# Altium PCB PCB_Button_Board_v2.3.PcbDoc (part 2 of 2)
Units mil, origin at the board's own origin, x right, y up, seen from the top; angles counter-clockwise.
Board outline 1338.58 x 1496.06 mil, 4 copper layers (Top Layer, GND, POWER, Bottom Layer), stack 61.811 mil thick; 73 components, 46 nets, 199 pads, 133 vias.
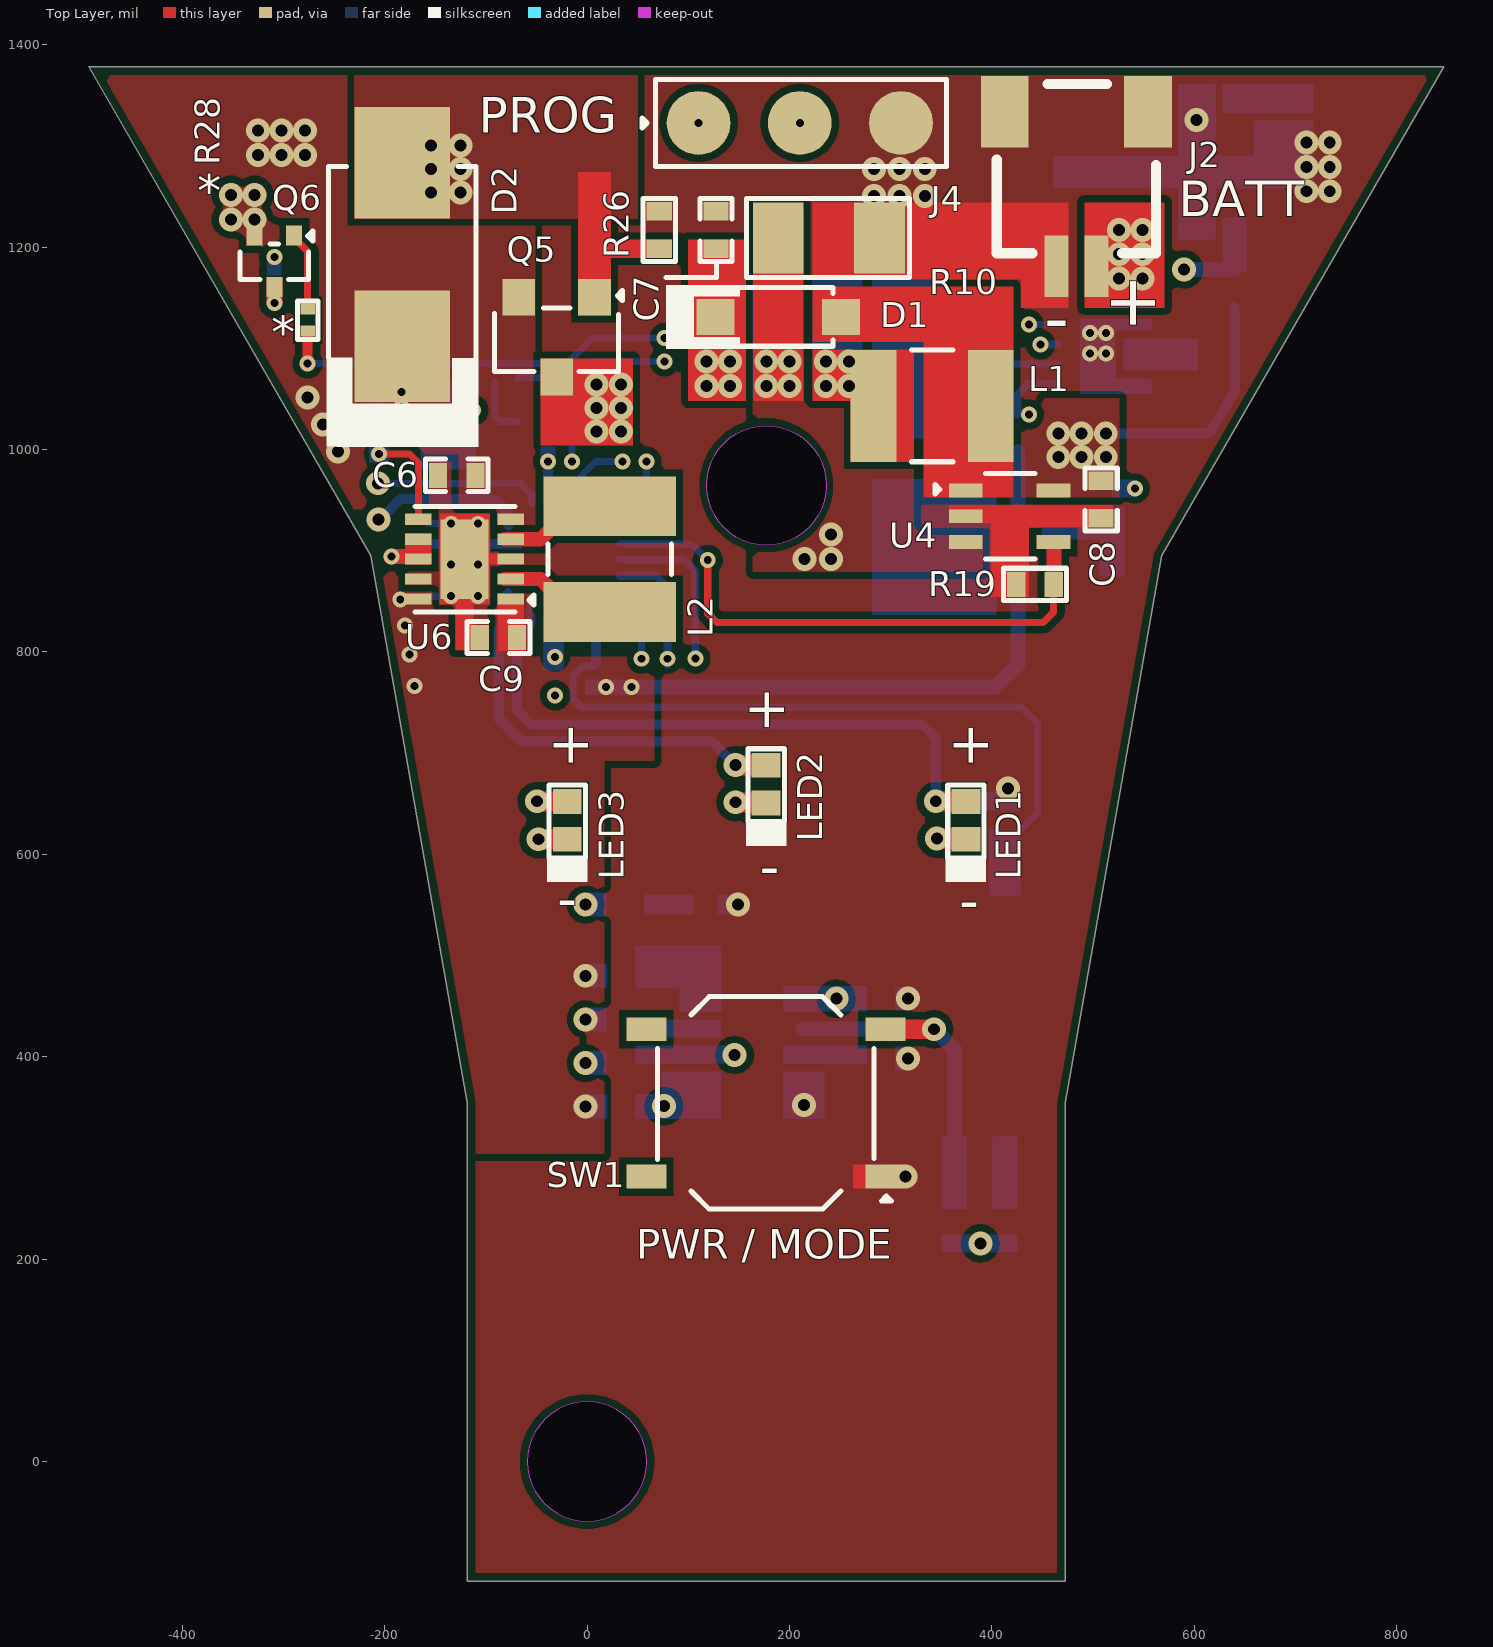
[diagram p0: Top Layer view]

## Part data (continued)
R21: library part RC0402FR-071KL, "RES 1K OHM 1% 1/16W 0402", Case Code (Imperial)=0402, Case Code (Metric)=1005, LCSC Part Number=C106235, Manufacturer=Yageo, Max Operating Temperature=155°C, Max Power Dissipation=63mW, Min Operating Temperature=-55°C, Power Rating=62.5mW, Resistance=1kR, Resistance Tolerance=1%, Resistor Type="Thick Film", Temperature Coefficient=100ppm/°C, Voltage Rating=50V, Case/Package=0402, Category="Chip SMD Resistors", ComponentLink1Description=https://datasheet.ciiva.com/11819/0900766b80c66297-11819477.pdf?src-supplier=RSComponents, ComponentLink1URL=https://datasheet.ciiva.com/11819/0900766b80c66297-11819477.pdf?src-supplier=RSComponents, ComponentLink2Description=https://datasheet.ciiva.com/7983/1018594-7983502.pdf?src-supplier=Element14, ComponentLink2URL=https://datasheet.ciiva.com/7983/1018594-7983502.pdf?src-supplier=Element14, ComponentLink3Description=https://datasheet.ciiva.com/22747/1018594-22747513.pdf?src-supplier=Element14, ComponentLink3URL=https://datasheet.ciiva.com/22747/1018594-22747513.pdf?src-supplier=Element14, ComponentLink4Description=https://datasheet.ciiva.com/12666/pyu-rc0402-51-rohs-l-6-r-12666741.pdf?src-supplier=Mouser, ComponentLink4URL=https://datasheet.ciiva.com/12666/pyu-rc0402-51-rohs-l-6-r-12666741.pdf?src-supplier=Mouser, ComponentLink5Description=https://datasheet.ciiva.com/7849/1018594-7849869.pdf?src-supplier=Element14, ComponentLink5URL=https://datasheet.ciiva.com/7849/1018594-7849869.pdf?src-supplier=Element14, ComponentLink6Description=https://datasheet.ciiva.com/7849/1018594-7849871.pdf?src-supplier=Element14, ComponentLink6URL=https://datasheet.ciiva.com/7849/1018594-7849871.pdf?src-supplier=Element14, ComponentLink7Description=https://datasheet.ciiva.com/17063/pyu-rc0402-51-rohs-l-6-r-17063193.pdf?src-supplier=Future+Electronics, ComponentLink7URL=https://datasheet.ciiva.com/17063/pyu-rc0402-51-rohs-l-6-r-17063193.pdf?src-supplier=Future+Electronics, Construction=Rectangular, Depth=0.5mm, Features="Moisture Resistant", Height=0.32mm, Item Type=Resistor, Lead Free="Lead Free", Length=1mm, Manufacturer Part Number=RC0402FR-071KL, Military Standard=Not, Number of Pins=2, Number of Terminations=2, Packaging="Tape and Reel", Pricing 1="10000=0.00085, 20000=0.00087, 40000=0.00084, 60000=0.00083, 80000=0.00079, 100000=0.00078, 1000000=0.00076 (USD)", Reach SVHC Compliant=Yes, RoHS=Yes, RoHS Compliant=Yes, Series=RC, Size Code=0402, Stock 1=13030000, Supplier 1=Avnet, Supplier Part Number 1=RC0402FR-071KL, Technology="THICK FILM", Termination=SMD/SMT, Tolerance=1%, Voltage Rating (DC)=50V, Width=0.5mm
R24 R25 R28: library part RC0201FR-072K2L, "RES 2.2K OHM 1% 1/20W 0201", Case Code (Imperial)=0201, Case Code (Metric)=0603, LCSC Part Number=C142018, Manufacturer=Yageo, Max Operating Temperature=125°C, Max Power Dissipation=50mW, Min Operating Temperature=-55°C, Resistance=2.2kR, Resistance Tolerance=1%, Resistor Type="Thick Film", Temperature Coefficient=200ppm/°C, Voltage Rating=25V, Case/Package=0201, Category="Chip SMD Resistors", ComponentLink1Description=https://datasheet.ciiva.com/7672/1563626-7672218.pdf?src-supplier=Element14, ComponentLink1URL=https://datasheet.ciiva.com/7672/1563626-7672218.pdf?src-supplier=Element14, Construction=Rectangular, Depth=0.3mm, Features="Moisture Resistant", Height=0.01inch, Item Type=Resistor, Lead Free="Lead Free", Length=0.024inch, Manufacturer Part Number=RC0201FR-072K2L, Military Standard=Not, Number of Terminations=2, Packaging="Tape and Reel", Power Rating=50mW, Pricing 1="10000=0.00510, 30000=0.00350, 50000=0.00330, 100000=0.00220 (USD)", RoHS=Yes, RoHS Compliant=Yes, Series=RC, Size Code=0201, Stock 1=90000, Supplier 1="Arrow Electronics", Supplier Part Number 1=RC0201FR-072K2L, Termination=SMD/SMT, Tolerance=1%, Width=0.3mm
R29: library part RC0201FR-0733RL, "RES 33 OHM 1% 1/20W 0201", LCSC Part Number=C295794, Manufacturer=Yageo, Supplier Part Number=6199285, Category="Chip SMD Resistors", ComponentLink1Description=https://datasheet.ciiva.com/2560/pyu-r-int-thick-7-2560877.pdf?src-supplier=Digi-Key, ComponentLink1URL=https://datasheet.ciiva.com/2560/pyu-r-int-thick-7-2560877.pdf?src-supplier=Digi-Key, ComponentLink2Description=https://datasheet.ciiva.com/2560/pyu-r-int-thick-7-2560878.pdf?src-supplier=Digi-Key, ComponentLink2URL=https://datasheet.ciiva.com/2560/pyu-r-int-thick-7-2560878.pdf?src-supplier=Digi-Key, ComponentLink3Description=https://datasheet.ciiva.com/2560/pyu-r-int-thick-7-2560879.pdf?src-supplier=Digi-Key, ComponentLink3URL=https://datasheet.ciiva.com/2560/pyu-r-int-thick-7-2560879.pdf?src-supplier=Digi-Key, ComponentLink4Description=https://datasheet.ciiva.com/7672/1563626-7672223.pdf?src-supplier=Element14, ComponentLink4URL=https://datasheet.ciiva.com/7672/1563626-7672223.pdf?src-supplier=Element14, ComponentLink5Description=https://datasheet.ciiva.com/22698/1563626-22698520.pdf?src-supplier=Element14, ComponentLink5URL=https://datasheet.ciiva.com/22698/1563626-22698520.pdf?src-supplier=Element14, Item Type=Resistor, Manufacturer Part Number=RC0201FR-0733RL, Pricing="10000=0.0013, 50000=0.0012, 250000=0.0012, 750000=0.0011, 2000000=0.001 (USD)", RoHS=Yes, Stock=1420000, Supplier="Future Electronics"
SW1: "No Gull Wing 50mA 100MΩ 80000 260gf@±50gf 12V -25℃~+85℃ 1.7mm Golden Round Button Brick nogging SPST SMD Tactile Switches ROHS", LCSC Part Number=C2845290, Manufacturer=HCTL, ComponentLink1Description=LCSC, ComponentLink1URL=https://www.lcsc.com/product-detail/Tactile-Switches_HCTL-TC-0522C-1-7-260G_C2845290.html, Item Type=Switch, Manufacturer Part Number=TC-0522C-1.7-260G
U1: "4.5V~5.5V 锂离子/Polymer 1 600mA SOT-23-5 Battery Management ICs ROHS", LCSC Part Number=C382138, Manufacturer=TPOWER, Package=SOT-23-5, ComponentLink1Description=LCSC, ComponentLink1URL=https://www.lcsc.com/product-detail/Battery-Management-ICs_TPOWER-TP4054_C382138.html, Item Type=IC, Manufacturer Part Number=TP4054
U2: "IC Pb On/off Controller TSOT23-8", Case/Package=SOT-23-8, LCSC Part Number=C683746, Manufacturer="Analog Devices / Linear Technology", Max Operating Temperature=85°C, Min Operating Temperature=-40°C, Operating Supply Current=6uA, Package Quantity=2500, Supplier Part Number 1=584-C2950ITS8-2TRPBF, Category="Integrated Circuits (ICs)", ComponentLink1Description=https://datasheet.ciiva.com/1967/7377-1967658.pdf?src-supplier=Digi-Key, ComponentLink1URL=https://datasheet.ciiva.com/1967/7377-1967658.pdf?src-supplier=Digi-Key, Item Type=IC, Length=2.9mm, Manufacturer Part Number=LTC2950ITS8-2#TRPBF, Number of Pins=8, Packaging="Tape and Reel", Pricing 1="1=6.42, 10=5.8, 50=5.53, 100=4.8, 1000=3.76, 10000=3.62 (USD)", RoHS=Yes, RoHS Compliant=Yes, Series=-, Stock 1=260, Supplier 1=Mouser
U3: "AVR tinyAVR™ 1, Functional Safety (FuSa) Microcontroller IC 8-Bit 20MHz 16KB (16K x 8) FLASH 20-VQFN (3x3)", Digikey Part Number=ATTINY1616-MNRDKR-ND, Manufacturer="Microchip Tech", Package=QFN-20-EP(3x3), ComponentLink1Description="Digikey Link", ComponentLink1URL=https://www.digikey.com/en/products/detail/microchip-technology/ATTINY1616-MNR/7354618?s=N4IgTCBcDaIIIBUEEkByBNAjANhwWgFlUAlEAXQF8g, Item Type=IC, Manufacturer Part Number=ATTINY1616-MNR
U4: "IC LED DRV RGLTR PWM 1.2A SC70-5", LCSC Part Number=C2928788, Manufacturer="Texas Instruments", Item Type=IC, Manufacturer Part Number=TPS92360DCKR, Pricing="1=0.91, 10=0.817, 25=0.7748, 100=0.6366, 250=0.59508, 500=0.52588, 1000=0.41517 (USD)", RoHS=No, Stock=4572, Supplier=Digikey
U5: "IC BATT MON LI-ION 1CELL 8TDFN", LCSC Part Number=C2682616, Manufacturer=Maxim, Max Operating Temperature=85°C, Min Operating Temperature=-20°C, Operating Supply Current=23uA, Operating Supply Voltage=4.5V, Output Voltage=400mV, Package Quantity=10000, Supplier Part Number 1=700-MAX17048G+T10, Category="Battery Management", ComponentLink1Description=https://datasheet.ciiva.com/14083/max17048-max17049-14083973.pdf?src-supplier=Digi-Key, ComponentLink1URL=https://datasheet.ciiva.com/14083/max17048-max17049-14083973.pdf?src-supplier=Digi-Key, Contact Plating=Tin,Matte, Item Type=IC, Manufacturer Part Number=MAX17048G+T10, Mount="Surface Mount", Number of Pins=8, Packaging="Tape and Reel", Pricing 1="1=3.34000, 10=3.00000, 50=2.84000, 100=2.46000, 1000=1.89000, 10000=1.83000 (USD)", Radiation Hardening=No, RoHS=Yes, RoHS Compliant=Yes, Series=ModelGauge™, Stock 1=41293, Supplier 1=Mouser
U6: "IC REG BUCK BST 3.3V 0.9A 10SON", LCSC Part Number=296-39461-1-ND, Manufacturer="Texas Instruments", ComponentLink1Description=https://datasheet.ciiva.com/2034/tps63030-2034702.pdf?src-supplier=Digikey, ComponentLink1URL=https://datasheet.ciiva.com/2034/tps63030-2034702.pdf?src-supplier=Digikey, ComponentLink2Description=https://datasheet.ciiva.com/3221/tps63030-3221513.pdf?src-supplier=Avnet, ComponentLink2URL=https://datasheet.ciiva.com/3221/tps63030-3221513.pdf?src-supplier=Avnet, Item Type=IC, Manufacturer Part Number=TPS63031DSKR, Pricing="1=2.06, 10=1.847, 25=1.7424, 100=1.4844, 250=1.3938, 500=1.21958, 1000=1.0105 (USD)", RoHS=Yes, Stock=6304, Supplier=Digikey
U7: "OPTOISOLATOR 3.75KV TRANS 4-SOP", LCSC Part Number=C81148, Manufacturer="Vishay Semiconductors", Voltage Rating (DC)=70V, ComponentLink1Description=https://datasheet.ciiva.com/11772/0900766b80e30939-11772485.pdf?src-supplier=Rs, ComponentLink1URL=https://datasheet.ciiva.com/11772/0900766b80e30939-11772485.pdf?src-supplier=Rs, ComponentLink2Description=https://datasheet.ciiva.com/27051/1107109-27051440.pdf?src-supplier=Jameco, ComponentLink2URL=https://datasheet.ciiva.com/27051/1107109-27051440.pdf?src-supplier=Jameco, ComponentLink3Description=https://datasheet.ciiva.com/8040/485045-8040879.pdf?src-supplier=Element14, ComponentLink3URL=https://datasheet.ciiva.com/8040/485045-8040879.pdf?src-supplier=Element14, ComponentLink4Description=https://datasheet.ciiva.com/14079/tcmt1100-14079945.pdf?src-supplier=Digikey, ComponentLink4URL=https://datasheet.ciiva.com/14079/tcmt1100-14079945.pdf?src-supplier=Digikey, ComponentLink5Description=https://datasheet.ciiva.com/14079/tcmt1100-14079946.pdf?src-supplier=Digikey, ComponentLink5URL=https://datasheet.ciiva.com/14079/tcmt1100-14079946.pdf?src-supplier=Digikey, ComponentLink6Description=https://datasheet.ciiva.com/8092/tcmt1100-8092285.pdf?src-supplier=Avnet, ComponentLink6URL=https://datasheet.ciiva.com/8092/tcmt1100-8092285.pdf?src-supplier=Avnet, ComponentLink7Description=https://datasheet.ciiva.com/12088/tcmt1100-103040-12088638.pdf?src-supplier=Mouser, ComponentLink7URL=https://datasheet.ciiva.com/12088/tcmt1100-103040-12088638.pdf?src-supplier=Mouser, Height=2.3mm, Item Type=Optocouplers, Lead Free=5697LeadFree, Manufacturer Part Number=TCMT1107, Pricing="1=0.6, 10=0.386, 50=0.386, 100=0.26, 1000=0.203, 10000=0.163 (USD)", RoHS=Yes, RoHS Compliant=5897YesNo, Stock=27846, Supplier=Mouser, Turn-Off Delay Time=4us, Turn-On Delay Time=1.5us

## Via types
v1: diameter 23.62, hole 11.81, Top Layer to Bottom Layer, tented both sides, 90 vias
v2: diameter 15.75, hole 7.87, Top Layer to Bottom Layer, tented both sides, 43 vias

## Nets (pads, with @x,y where several pads share a name; then routed paths per layer and width w, separated by ;. In a path a pad name is that pad's centre, name@x,y a point inside that pad or via, vN(x,y) a via of type N, cw(c..) or ccw(c..) an arc to the next point about the centre after c; other vN are vias at no path point)
25%: LED3.1 U3.5 | length 621.6
  Top Layer w20: v1@-47.83,652.24 LED3.1
  POWER w10: v1(-206.11,930.67) -187.21,949.57 -89.74,949.57 -49.42,909.25 v1(-49.42,652.39)
  Bottom Layer w7: v1(-206.11,930.67) v1@-205.83,930.67
  Bottom Layer w10: v1@-205.83,930.67 -204.84,930.67 -184.44,951.07 -91.24,951.07 -77.52,937.35 U3.5@-77.52,924.79
50%: LED2.1 U3.1 | length 409.4
  Top Layer w20: v1@148.9,688.05 LED2.1@177.17,688.05
  Bottom Layer w10: U3.1@-77.96,858.11 -77.96,831.17 -87.38,821.74 -87.38,734.32 -64.35,711.29 123.61,711.29 v1(146.85,688.05)
75%: LED1.1 U3.20 | length 615.1
  Top Layer w20: v1@346.17,652.24 LED1.1
  Bottom Layer w7: U3.20@-54.33,827.02 U3.20
  Bottom Layer w10: U3.20@-56.4,827.01 -57.06,826.35 -69.34,814.07 -69.34,742.31 -55.33,728.29 331.35,728.29 344.58,715.06 v1(344.58,652.39)
B_CHG: R29.2 U3.7
  other v2: -38.66,988.21
BATT_CHG: R1.2 R24.2 R28.1 U1.1 | length 1015.5
  Top Layer w10: v2(-276,1085) R28.1
  POWER w10: v2(76.51,1109.97) 107.91,1141.37 574.63,1141.37 589.96,1156.7 v1(589.96,1177.89) v1@589.96,1182.15
  Bottom Layer w7: v2(-276,1085) -169.97,1085 R24.2@-156.38,1071.41 ; R24.2 -154.56,1069.09 -138.65,1085 -19.69,1085 5.28,1109.97 v2(76.51,1109.97)
  Bottom Layer w15: v1(589.96,1177.89) R1.2@639.96,1177.89
CTRL_SIG: R19.2 U3.12 U4.4 | length 565
  Top Layer w7: v2(119.3,890.78) 119.3,838.13 128.54,828.89 450.76,828.89 461.14,839.27 R19.2 ; U4.4 U4.4@461.14,908.11
  Top Layer w15: R19.2@461.32,866.81 U4.4@461.32,907.81
  Bottom Layer w7: U3.12 103.33,906.75 v2(119.3,890.78)
GND: C1.1 C2.1 C3.1 C4.1 C6.2 C7.1 C8.1 C9.2 C10.1 C12.1 C13.1 C14.1 C15.1 J2.2 J2.3 J2.4 J4.3 P5.1 P8.1 Q1.2 Q2.2 Q4.2 Q6.2 R3.1 R7.1 R8.2 R10.1 R12.2 R14.2 R15.2 R19.1 R26.1 SW1.1 U1.2 U2.4 U3.3 U3.21 U4.2 U5.1 U5.4 U5.9 U6.3 U6.9 U6.11 U7.3 | length 46.8
  Bottom Layer w7: C1.1 -157.42,854.99 -134.76,854.99 v2(-134.47,855.28) ; C2.1 -157.65,926.68 -134.53,926.68 v2(-134.47,926.62)
  other v1: 314.56,281.46 214.24,352.45 317,398.2 -1.45,436.85 317,457.39 149.19,550.39 416,664.89 -351.79,1227.38 -328.69,1227.38 283.55,1250.54 308.65,1250.54 333.76,1250.54 -351.79,1251.49 -328.69,1251.49 710.8,1255.13 733.9,1255.13 283.55,1277 308.65,1277 333.76,1277 710.8,1279.23 733.9,1279.23 710.8,1303.34 733.9,1303.34 602.11,1325.55
  other v2: -107.71,855.28 -134.47,886.45 -107.71,886.45 -107.71,926.62 -112.4,1038.75 497,1095 513,1095 497,1115 513,1115
GPOUT: R5.2 U3.6 U5.5 | length 1119.5
  POWER w10: v1(-206.38,966.57) -82.7,966.57 51.05,832.82 418.52,832.82 436.85,851.15 v2(436.85,1034.41)
  Bottom Layer w7: v1(-206.38,966.57) -66.43,966.57 -56.26,956.4 -55.75,956.4 -54.33,954.98 U3.6
  Bottom Layer w8: R5.2 425.42,1054.32 435.51,1064.41 U5.5
LDO_EN: Q3.3 R2.2 U6.6 | length 98.3
  Top Layer w7: v2(-205.68,995.45) -175.56,995.45 -166.58,986.47 U6.6
LED_R_NEG: P1.1 R16.2
LED_W_NEG: P3.1 R10.2 U4.3
  other v1: 215.02,891.93 241.12,891.93 241.12,916.03 177.14,1062.85 200.25,1062.85 177.14,1086.96 200.25,1086.96
LED_W_POS: C7.2 D1.2 P4.1 | length 38
  Bottom Layer w12: P4.1@129.13,1111 P4.1@129.27,1111.14 ; P4.1@129.27,1148.75 P4.1@129.41,1148.89
  Bottom Layer w20: P4.1@129.27,1111.14 P4.1@129.27,1148.75
  other v1: 118.15,1062.78 141.26,1062.78 118.15,1086.89 141.26,1086.89
M_BUTTON: C15.2 R13.1 U3.16 U7.4 | length 656.8
  Bottom Layer w7: R13.1 7.79,785.95 -3.92,785.95 -13.65,776.22 -13.65,753.22 -5.73,745.29 429.28,745.29 445,729.57 445,640.64 416,611.64 416,602.89
NetC13_2: C13.2 U2.3
NetC14_2: C14.2 U2.7
NetD1_1: D1.1 L1.2 U4.1
NetL2_1: L2.1 U6.4 | length 117.8
  Top Layer w14: U6.4@-81.34,911.29 U6.4 -45.89,911.29 -12.29,944.88 L2.1@22.53,944.88
NetL2_2: L2.2 U6.2 | length 48.3
  Top Layer w14: U6.2@-81.35,871.92 U6.2 -45.9,871.92 L2.2@-36.82,862.84
NetLED1_2: LED1.2 R8.1 | length 29.1
  Top Layer w7: LED1.2@373.86,615.4 LED1.2
  Top Layer w20: v1(345.6,615.4) LED1.2@373.86,615.4
NetLED2_2: LED2.2 R14.1 | length 28.3
  Top Layer w20: v1@148.34,651.1 LED2.2@176.6,651.1
  other v1: 146.85,651.4
NetLED3_2: LED3.2 R15.1 | length 28.3
  Top Layer w20: v1(-47.83,614.83) LED3.2
NetQ1_1: Q1.1 R11.2 R12.1
NetQ1_3: Q1.3 R16.1
NetQ2_1: Q2.1 R21.1
NetQ2_3: Q2.3 R20.2 U2.8
NetQ3_1: Q3.1 R24.1 | length 57.6
  Bottom Layer w7: Q3.1@-154.34,1027.91 -138.12,1027.91 -132.91,1033.12 R24.1
NetQ3_2: Q3.2 Q4.3
NetQ4_1: Q4.1 R25.1 | length 57.9
  Bottom Layer w7: R25.1 -91,1033.12 -85.78,1027.91 -69.56,1027.91 Q4.1
NetQ6_1: Q6.1 R28.2 | length 77.5
  Top Layer w7: Q6.1@-290.52,1210.19 -276,1195.68 R28.2
NetQ6_3: Q6.3 R27.2 R29.1 | length 489.5
  GND w7: v2(-309,1144.62) -34.95,1144.62 -14.95,1124.62 v2(-14.95,988.21)
  Bottom Layer w7: R29.1 -21.43,1019.05 -14.95,1012.57 v2(-14.95,988.21)
NetR3_2: R3.2 U1.5
NetR4_1: R4.1 U3.19
  other v2: -31.55,794.99
NetR6_2: R6.2 U7.1
NetR7_2: R7.2 U5.6 | length 126.3
  Bottom Layer w7: R7.2@385.36,1031.78 385.36,1072.78 396.89,1084.32 465.61,1084.32 U5.6
P_BUTTON: R18.2 SW1.4 U2.2 U7.2 | length 251.4
  Bottom Layer w15: U2.2 214.52,427.46 342.44,427.46 v1(342.78,427.13) 363,406.91 U7.2
PUSH_CON: R9.1 R25.2 U2.6 | length 1094.8
  GND w7: v2(76.51,1086.89) 76.51,970.33 -79.56,814.26 -79.56,611.08 -57.95,589.48 69.6,589.48 93.22,565.86 93.22,413.49 105.05,401.66 v1(145.83,401.66)
  Bottom Layer w7: R25.2@-69.13,1069.3 -67.53,1070.9 -12.5,1070.9 3.48,1086.89 v2(76.51,1086.89)
RED_LED: R11.1 U3.15 | length 747.5
  GND w7: v2(53.98,793.2) 88.79,758.39 341.95,758.39 389.03,805.47 389.03,943.97 406.56,961.51 v2(541.36,961.51)
  Bottom Layer w7: U3.15 33.7,858.08 42.56,858.08 53.98,846.66 v2(53.98,793.2)
SCL: R23.2 U3.14 U5.7 | length 819.9
  GND w7: v2(79.47,793.2) 97.28,775.39 333.45,775.39 370.66,812.61 370.66,1087.91 386.53,1103.78 v2(448.19,1103.78)
  Bottom Layer w8: U3.14 68.07,875.25 79.47,863.85 R23.2@79.47,786.9 ; v2(448.19,1103.78) U5.7
SDA: R22.2 U3.13 U5.8 | length 822.6
  GND w7: v2(107.04,793.26) 321.2,793.26 351.56,823.62 351.56,1098.56 376.5,1123.5 v2(436.85,1123.5)
  Bottom Layer w7: U3.13 95.97,891 106.96,880.01 106.96,793.34 v2(107.04,793.26) ; v2(436.85,1123.5) U5.8
U_INT: R17.2 U2.5 U3.10 | length 929.4
  GND w7: v2(58.64,988.21) 56.96,986.53 56.96,970.58 -93.56,820.06 -93.56,605.28 -85.54,597.27 -60.75,572.48 62.56,572.48 75.91,559.12 v1(75.91,351.14)
  Bottom Layer w7: U3.10 49.73,946.12 58.64,955.02 v2(58.64,988.21)
U_KILL: R21.2 U3.9 | length 652
  GND w7: v1(-1.45,550.34) -58.41,550.34 -99.54,591.47 -107.56,599.48 -107.56,825.86 35.13,968.54 v2(35.13,988.21)
  Bottom Layer w7: U3.9 -7.09,972.68 8.44,988.21 36.5,988.21 v2@37.3,989.01
UPDI: J4.2 R4.2 | length 894.7
  GND w7: v2(-31.55,756.99) 46.67,835.21 297.78,835.21 308.95,846.38 308.95,1141.05 210.24,1239.76 v2(210.24,1322.66)
VBAT: C4.2 C10.2 J2.1 Q5.3 U1.3 U5.2 U5.3
  other v1: 9.34,1017.81 33.45,1017.81 9.34,1040.92 33.45,1040.92 9.34,1064.02 33.45,1064.02 525.63,1168.82 548.73,1168.82 525.63,1192.93 548.73,1192.93 525.63,1217.04 548.73,1217.04
VBATT: C6.1 C8.2 C12.2 D2.2 L1.1 P2.1 Q5.2 R1.1 R2.1 R6.1 R9.2 R18.1 U2.1 U4.5 U6.5 U6.7 U6.8 | length 271.7
  Top Layer w15: v2(-193.38,894.07) -193.24,894.21 -172.17,894.21 -166.58,899.8 -166.58,901.45
  Bottom Layer w10: v1@505.6,1015.72 613.43,1015.72 617.24,1019.52 639.9,1057.35 R1.1@639.9,1140.89
  other v1: 388.68,215.54 -1.45,393.75 246.34,457.33 465.66,992.61 488.49,992.61 512.6,992.61 -245.94,998.1 465.66,1015.72 488.49,1015.72 512.6,1015.72 -260.97,1024.73 -276,1051.36 235.92,1062.85 259.03,1062.85 235.92,1086.96 259.03,1086.96 -325.04,1291.01 -301.93,1291.01 -278.83,1291.01 -325.04,1315.12 -301.93,1315.12 -278.83,1315.12
  other v2: -183.17,1027.69 -183.17,1042 -183.17,1056.8
VCC_3V3: C1.2 C2.2 C9.1 J4.1 R5.1 R13.2 R17.1 R20.1 R22.1 R23.1 R27.1 U3.4 U6.1 U6.10 | length 2406.5
  GND w10: v2(18.66,765.17) 19.76,766.27 19.76,786.33 48.25,814.81 309.55,814.81 331.5,836.76 331.5,1149.62 235.58,1245.54 235.58,1332.81 222.85,1345.54 133.12,1345.54 v2(110.24,1322.66)
  POWER w15: v2(-309,1190.12) -363.98,1190.12 -368.37,1194.51 -369.82,1195.96 -398,1245.88 -398,1326 -362.17,1361.83 71.07,1361.83 v2(110.24,1322.66)
  Bottom Layer w15: R13.2 v2(18.66,765.17) v2(44.02,765.17) R23.1 R22.1 403.37,765.17 425.81,787.61 R5.1@425.81,997.58
  other v1: -1.45,350.7 -1.45,479.94
  other v2: -170.55,766.43 -175.56,797.39 -179.67,826.09 -184.54,851.56
VUSB: C3.2 D2.1 P6.1 P7.1 Q5.1 R26.2 U1.4
  other v1: -154.13,1254.1 -125.03,1254.1 -154.13,1277.21 -125.03,1277.21 -154.13,1300.31 -125.03,1300.31
pads on no net: SW1.2 SW1.3 U3.2 U3.8 U3.11 U3.17 U3.18

## Polygon pours and split planes (outlines as drawn)
VUSB on Bottom Layer "VUSB_L04_P023" (solid, pour order 23): 576.96,1297.67 256.83,1297.67 256.83,1258 -73.92,1258 -87.09,1244.83 -87.09,1095.71 -200.77,1095.71 -200.77,1377.95 576.96,1377.95
LED_W_NEG on Bottom Layer "LED_W_NEG_L04_P029" (solid, pour order 29): 274.06,1040.86 274.06,879.13 164,879.13 164,1089.74 214,1089.74 214,1048 221.14,1040.86 253.59,1040.86
VBAT on Bottom Layer "VBAT_L04_P021" (solid, pour order 21): 460.56,1136.59 565.85,1136.59 565.85,1107.68 532,1107.68 530,1109.69 530,1078.19 603.76,1078.19 603.76,1223.86 576.96,1250.66 460.56,1250.66
VCC_3V3 on Bottom Layer "VCC_3V3_L04_P010" (solid, pour order 10): -144.52,878.4 -144.52,753.13 -200.61,753.13 -200.61,911.67 -64.18,911.67 -64.18,901.83 -121.09,901.83
GND on Bottom Layer "GND_L04_P027" (solid, remove dead copper, pour order 27): -492.11,1377.89 845.89,1377.89 837.89,1363.89 817.89,1328.89 799.89,1296.89 763.89,1234.89 738.89,1191.89 701.89,1126.89 610.89,968.89 567.89,895.89 545.89,773.89 492.89,472.89 472.89,354.89 472.89,-118.11 -118.11,-118.11 -118.11,354.89 -120.11,369.89 -136.11,457.89 -158.11,581.89 -197.11,802.89 -213.11,894.89 -237.11,936.89 -264.11,983.89
VUSB on Top Layer "VUSB_L01_P022" (solid, pour order 22): -34.79,1228.09 -229.84,1228.09 -229.84,1369.8 50,1369.8 50,1228.09
VBATT on Top Layer "VBATT_L01_P011" (solid, pour order 11): 429.03,952.71 429.03,1050.63 526,1050.63 526,952.71
VBATT on Top Layer "VBATT_L01_P026" (solid, pour order 26): -51.26,1221.09 -236.84,1221.09 -236.84,1377.95 -492.13,1377.95 -230.39,925.46 -166.58,925.46 -166.58,995.45 -126.78,995.45 -126.78,925.46 -51.26,925.46
LED_W_NEG on Top Layer "LED_W_NEG_L01_P025" (solid, pour order 25): 323.06,980.69 323.06,923.48 331.23,915.31 390.95,915.31 390.95,879.13 164,879.13 164,1089.74 214,1089.74 214,1048 221.14,1040.86 253.59,1040.86 253.59,980.69
VCC_3V3 on Top Layer "VCC_3V3_L01_P024" (solid, pour order 24): -54.1,794.99 66.51,794.99 66.51,692.39 17,692.39 17,304 -113.93,304 -118.11,308.18 -118.11,354.33 -211.87,886.09 -54.1,886.09
GND on Top Layer "GND_L01_P028" (solid, remove dead copper, pour order 28): 541.81,750.69 567.84,895.38 646.11,1042.44 741.24,1195.89 799.89,1296.89 817.89,1328.89 845.89,1377.89 -492.11,1377.89 -264.11,983.89 -237.11,936.89 -213.11,894.89 -197.11,802.89 -158.11,581.89 -136.11,457.89 -120.11,369.89 -118.11,354.89 -118.11,-118.11 472.89,-118.11 472.89,354.89 492.89,472.89
VBAT on POWER "VBAT_L03_P018" (solid, pour order 18): -48.66,1185.19 -3.16,1230.69 562.32,1230.69 562.32,1156.69 97.96,1156.69 58.64,1117.37 58.64,1004 -48.66,1004
VBATT on POWER "VBATT_L03_P019" (solid, pour order 19): -118.11,-118.11 -118.11,354.33 -213.51,895.38 -492.13,1377.95 846.46,1377.95 567.84,895.38 472.44,354.33 472.44,-118.11
GND on GND "GND_L02_P017" (solid, pour order 17): -118.11,-118.11 -118.11,354.33 -213.51,895.38 -492.13,1377.95 846.46,1377.95 567.84,895.38 472.44,354.33 472.44,-118.11

## Other copper
Top Layer:
  rectangle net VBATT: 260.59,987.69 323.06,1099
  rectangle net VBAT: 491.46,1140 570.84,1244
  rectangle net VUSB: -8.74,1132.26 23.54,1274.1
  rectangle net VBAT: -46.14,1004 45.65,1089.74
  rectangle net GND: 223.04,1168 475.71,1244
  rectangle net NetD1_1: 223.04,1106.41 402.32,1161
  rectangle net VUSB: -8.74,1189.4 83.89,1207.4
  rectangle net VBATT: 223.04,1048 316.56,1099
  rectangle net NetD1_1: 332.51,952.71 421.41,1161
  rectangle net GND: -130.04,801.69 -112.04,862.84
  region net NetQ6_3: -301.13,1170.65 -316.87,1170.65 -316.87,1144.62 -301.13,1144.62
  rectangle net GND: -336.56,1201.35 -320.81,1227.38
  rectangle net GND: -146,846.72 -96,936.48
  region net GND: -121.01,897.11 -121.01,886.09 -62.35,886.09 -62.35,897.11
  region net VBATT: -179.67,916.8 -179.67,886.09 -153.49,886.09 -153.49,916.8
  region net VCC_3V3: -88.53,857.74 -88.53,801.09 -62.35,801.09 -62.35,857.74
  rectangle net LED_W_POS: 100,1048 157,1207.4
  rectangle net GND: 398.59,922.97 520.45,944.97
  rectangle net GND: 398.59,854.13 436.59,944.97
  rectangle net GND: 357.48,927.12 436.58,944.97
  rectangle net GND: 428.74,1140 475.71,1238
  rectangle net LED_W_NEG: 164,1048 214,1238
  region net P_BUTTON: 342.78,436.57 294.88,436.57 294.88,417.5 342.78,417.5
  rectangle net GND: 262.97,269.65 294.88,293.27
Bottom Layer:
  rectangle net VCC_3V3: -1.98,757.67 8.66,772.71
  rectangle net NetR4_1: -43.51,781.51 -22.98,809.79
  rectangle net NetR4_1: -43.51,781.51 -33.66,835.88
  region net VCC_3V3: -301.72,1190.12 -316.28,1190.12 -316.28,1172.08 -301.72,1172.08
  rectangle net NetQ6_3: -316.28,1144.71 -301.72,1161.05
  rectangle net VCC_3V3: -166.71,901.83 -64.18,911.67
  region net U_KILL: 19.72,562.15 -1.45,562.15 -1.45,538.52 19.72,538.52
  rectangle net RED_LED: 518.86,952.51 541.36,970.51
  rectangle net GND: 373.89,643.39 428.5,661.39
  rectangle net M_BUTTON: 397.25,559.03 428.75,624.39
  rectangle net LDO_EN: -210.32,1008 -199.69,1074.4
  rectangle net NetQ1_1: 449.07,911.15 531.36,943.43
  rectangle net NetQ1_1: 506.36,874.57 531.36,927.51
  rectangle net VBATT: 193.51,444.53 276.5,469.89
  rectangle net U_INT: 73.81,338.26 132.49,385.47
  rectangle net U_INT: 47.72,338.26 132.49,363.26
  rectangle net PUSH_CON: 47.72,393.35 138.11,411.06
  rectangle net NetQ3_2: -164.6,980.44 -110.09,1008
  region net NetLED3_2: -46.96,623.83 -46.96,605.83 -11.61,605.83 -11.61,623.83
  region net NetLED2_2: 146.85,660.39 146.85,642.39 184.39,642.39 184.39,660.39
  rectangle net 75%: -59.79,822.1 -54.33,849.66
  rectangle net LDO_EN: -215.39,987.33 -195.31,1015.87
  rectangle net B_CHG: -45.95,987.01 -31.38,1002.71
  region net B_CHG: -33.66,987.01 -43.51,987.01 -43.51,946.12 -33.66,946.12
  rectangle net M_BUTTON: 3.74,786.82 13.58,835.88
  rectangle net NetQ1_3: 281.56,836.34 404.55,970.7
  rectangle net GND: 487.12,1054.6 522.12,1129.37
  rectangle net GND: 489.05,1054.6 557.56,1070.27
  rectangle net GND: 489.06,1117.56 557.56,1129.37
  rectangle net VBAT: 530,1078.19 603.76,1109.69
  rectangle net LED_W_POS: 104.58,1051 154.57,1167.64
  rectangle net LED_W_NEG: 163.57,1051.07 213.55,1167.64
  rectangle net VBATT: 222.35,1051.07 272.34,1167.64
  rectangle net LED_R_NEG: 281.56,1010.7 351.56,1167.64
  rectangle net GND: 584,1207.35 621,1361.25
  rectangle net GND: 659,1258 717.8,1325
  rectangle net GND: 460.56,1258 717.8,1290.53
  rectangle net BATT_CHG: 628.14,1175.89 651.77,1229
  region net NetLED1_2: 346.04,624.39 346.04,606.39 381.39,606.39 381.39,624.39
  rectangle net GND: 128.81,540.35 153.72,560.43
  rectangle net NetQ2_1: 56.72,540.35 105.19,560.43
  rectangle net VBATT: 350.5,206.5 425.5,224.5
  rectangle net GND: 193.51,338.26 234.85,385.47
  region net VCC_3V3: 19.72,362.51 -1.45,362.51 -1.45,338.88 19.72,338.88
  region net VCC_3V3: 19.72,491.76 -1.45,491.76 -1.45,468.13 19.72,468.13
  region net VBATT: 19.72,405.56 -1.45,405.56 -1.45,381.93 19.72,381.93
  region net GND: 19.72,448.66 -1.45,448.66 -1.45,425.03 19.72,425.03
  rectangle net GND: 304.5,386.45 317,410.08
  rectangle net GND: 304.5,445.63 317,469.26
  rectangle net GND: 304.5,457.39 325.66,457.44
  rectangle net NetR3_2: 628.14,1332.16 717.8,1361.25
  rectangle net NetR6_2: 400.5,249.5 425.5,321
  rectangle net P_BUTTON: 350.5,249.5 375.5,321
  rectangle net NetC13_2: 193.51,393.35 276.5,411.06
  rectangle net NetQ2_3: 47.72,467.5 133,509.65
  rectangle net NetQ2_3: 91.15,444.53 133,509.65
  rectangle net NetC14_2: 47.72,418.94 132.49,436.65

## Silkscreen, mask and mechanical layers (free items; w line width, h text height)
Top Overlay:
  lines w5: 78.03,1170 128.06,1170 ; 127.47,1170.6 128.06,1170 ; 128.06,1185.3 128.06,1170 ; 343.78,964.91 343.78,955.78 348.59,960.59 343.78,965.41
  text "PROG" at -107.05,1301.28 h60
  text "*" at -385,1226.24 h60
  text "BATT" at 584.83,1218.34 h60
  text "+" at 561.29,1115.69 h50 r90
  text "-" at 476.29,1105.19 h50
  text "*" at -312.15,1086.69 h60
  text "+" at 195.05,719.39 h40 r90
  text "+" at 1,684.65 h40 r90
  text "+" at 396.44,684.73 h40 r90
  text "-" at 190.28,568.53 h40
  text "-" at -9.56,536.55 h40
  text "-" at 387.81,534.62 h40
  text "PWR / MODE" at 48.59,190.62 h50
Bottom Overlay:
  text "LED" at 267.18,1181.83 h60
  text "USB" at -89.83,1180.17 h60
Dimensions:
  drawing of 13831 lines, arcs and shapes, not listed
  text "Layer" at 1697.2,1272 h60
  text "Name" at 2107.11,1272 h60
  text "Material" at 3036.85,1272 h60
  text "Thickness" at 3896.62,1272 h60
  text "Constant" at 4546.46,1272 h60
  text "Board Layer Stack" at 5116.32,1272 h60
  text "Top Overlay" at 2107.11,1152 h60
  text "Top Solder" at 2107.11,1032 h60
  text "Solder Resist" at 3036.85,1032 h60
  text "0.010mm" at 3896.62,1032 h60
  text "3.5" at 4546.46,1032 h60
  text "1" at 1697.2,912 h60
  text "Top Layer" at 2107.11,912 h60
  text "0.035mm" at 3896.62,912 h60
  text "Dielectric 2" at 2107.11,792 h60
  text "PP-006" at 3036.85,792 h60
  text "0.200mm" at 3896.62,792 h60
  text "4.1" at 4546.46,792 h60
  text "2" at 1697.2,672 h60
  text "GND" at 2107.11,672 h60
  text "CF-004" at 3036.85,672 h60
  text "0.035mm" at 3896.62,672 h60
  text "Dielectric 1" at 2107.11,552 h60
  text "FR-4" at 3036.85,552 h60
  text "1.030mm" at 3896.62,552 h60
  text "4.8" at 4546.46,552 h60
  text "3" at 1697.2,432 h60
  text "POWER" at 2107.11,432 h60
  text "CF-004" at 3036.85,432 h60
  text "0.035mm" at 3896.62,432 h60
  text "Dielectric 3" at 2107.11,312 h60
  text "PP-006" at 3036.85,312 h60
  text "0.200mm" at 3896.62,312 h60
  text "4.1" at 4546.46,312 h60
  text "4" at 1697.2,192 h60
  text "Bottom Layer" at 2107.11,192 h60
  text "0.035mm" at 3896.62,192 h60
  text "Bottom Solder" at 2107.11,72 h60
  text "Solder Resist" at 3036.85,72 h60
  text "0.010mm" at 3896.62,72 h60
  text "3.5" at 4546.46,72 h60
  text "Bottom Overlay" at 2107.11,-48 h60
  text "Total board thickness:" at 1697.2,-168 h60
  text "1.590mm" at 3896.62,-168 h60
Board Shape:
  circle w5: c0,0 r59.06
  circle w5: c177.17,964.57 r59.06
  lines w10: -492.13,1377.95 -213.51,895.38 -118.11,354.33 -118.11,0 -118.11,-118.11 0,-118.11 472.44,-118.11 472.44,354.33 567.84,895.38 846.46,1377.95 -492.13,1377.95
Drill Drawing:
  circle w10: c-453.38,2324.83 r33.33
  lines w10: -486.71,2141.5 -420.04,2141.5 -420.04,2208.17 -486.71,2208.17 -486.71,2141.5
  lines w15: -546.5,2096.5 9954.59,2096.5 ; -546.5,2396.5 9954.59,2396.5 ; 4.38,1946.5 4.38,2546.5 ; 594.22,1946.5 594.22,2546.5 ; 1663.91,1946.5 1663.91,2546.5 ; 2169.79,1946.5 2169.79,2546.5 ; 2903.59,1946.5 2903.59,2546.5 ; 4403.14,1946.5 4403.14,2546.5 ; 4992.99,1946.5 4992.99,2546.5 ; 5738.78,1946.5 5738.78,2546.5 ; 6388.61,1946.5 6388.61,2546.5 ; 7242.38,1946.5 7242.38,2546.5 ; 8575.98,1946.5 8575.98,2546.5 ; -546.5,1946.5 9954.59,1946.5 9954.59,2546.5 -546.5,2546.5 -546.5,1946.5
  text "Symbol" at -456.5,2441.5 h72
  text "Count" at 49.38,2441.5 h72
  text "Hole Size" at 639.22,2441.5 h72
  text "Plated" at 1708.91,2441.5 h72
  text "Hole Type" at 2214.79,2441.5 h72
  text "Drill Layer Pair" at 2948.59,2441.5 h72
  text "Via/Pad" at 4448.14,2441.5 h72
  text "Pad Shape" at 5037.99,2441.5 h72
  text "Template" at 5783.78,2441.5 h72
  text "Description" at 6433.61,2441.5 h72
  text "Hole Tolerance (+)" at 7287.38,2441.5 h72
  text "Hole Tolerance (-)" at 8620.98,2441.5 h72
  text "43" at 49.38,2291.5 h60
  text "0.200mm (7.87mil)" at 639.22,2291.5 h60
  text "PTH" at 1708.91,2291.5 h60
  text "Round" at 2214.79,2291.5 h60
  text "Top Layer - Bottom Layer" at 2948.59,2291.5 h60
  text "Via" at 4448.14,2291.5 h60
  text "Rounded" at 5037.99,2291.5 h60
  text "(Mixed)" at 5783.78,2291.5 h60
  text "90" at 49.38,2141.5 h60
  text "0.300mm (11.81mil)" at 639.22,2141.5 h60
  text "PTH" at 1708.91,2141.5 h60
  text "Round" at 2214.79,2141.5 h60
  text "Top Layer - Bottom Layer" at 2948.59,2141.5 h60
  text "Via" at 4448.14,2141.5 h60
  text "Rounded" at 5037.99,2141.5 h60
  text "(Mixed)" at 5783.78,2141.5 h60
  text "133 Total" at 49.38,1991.5 h60

## Dimensions
846.46,1377.95 to 480.89,-121.11 on Dimensions
-492.13,1377.95 to 846.46,1377.95 on Dimensions
472.44,-118.11 to -118.11,-118.11 on Dimensions